# Altium PCB PCB_GTV3.3.PcbDoc (part 8 of 11)
Units mil, origin at the board's own origin, x right, y up, seen from the top; angles counter-clockwise.
Board outline 8070.87 x 4881.89 mil, 4 copper layers (Top Layer, GND, PWR, Bottom Layer), stack 61.653 mil thick; 464 components, 293 nets, 1458 pads, 748 vias.
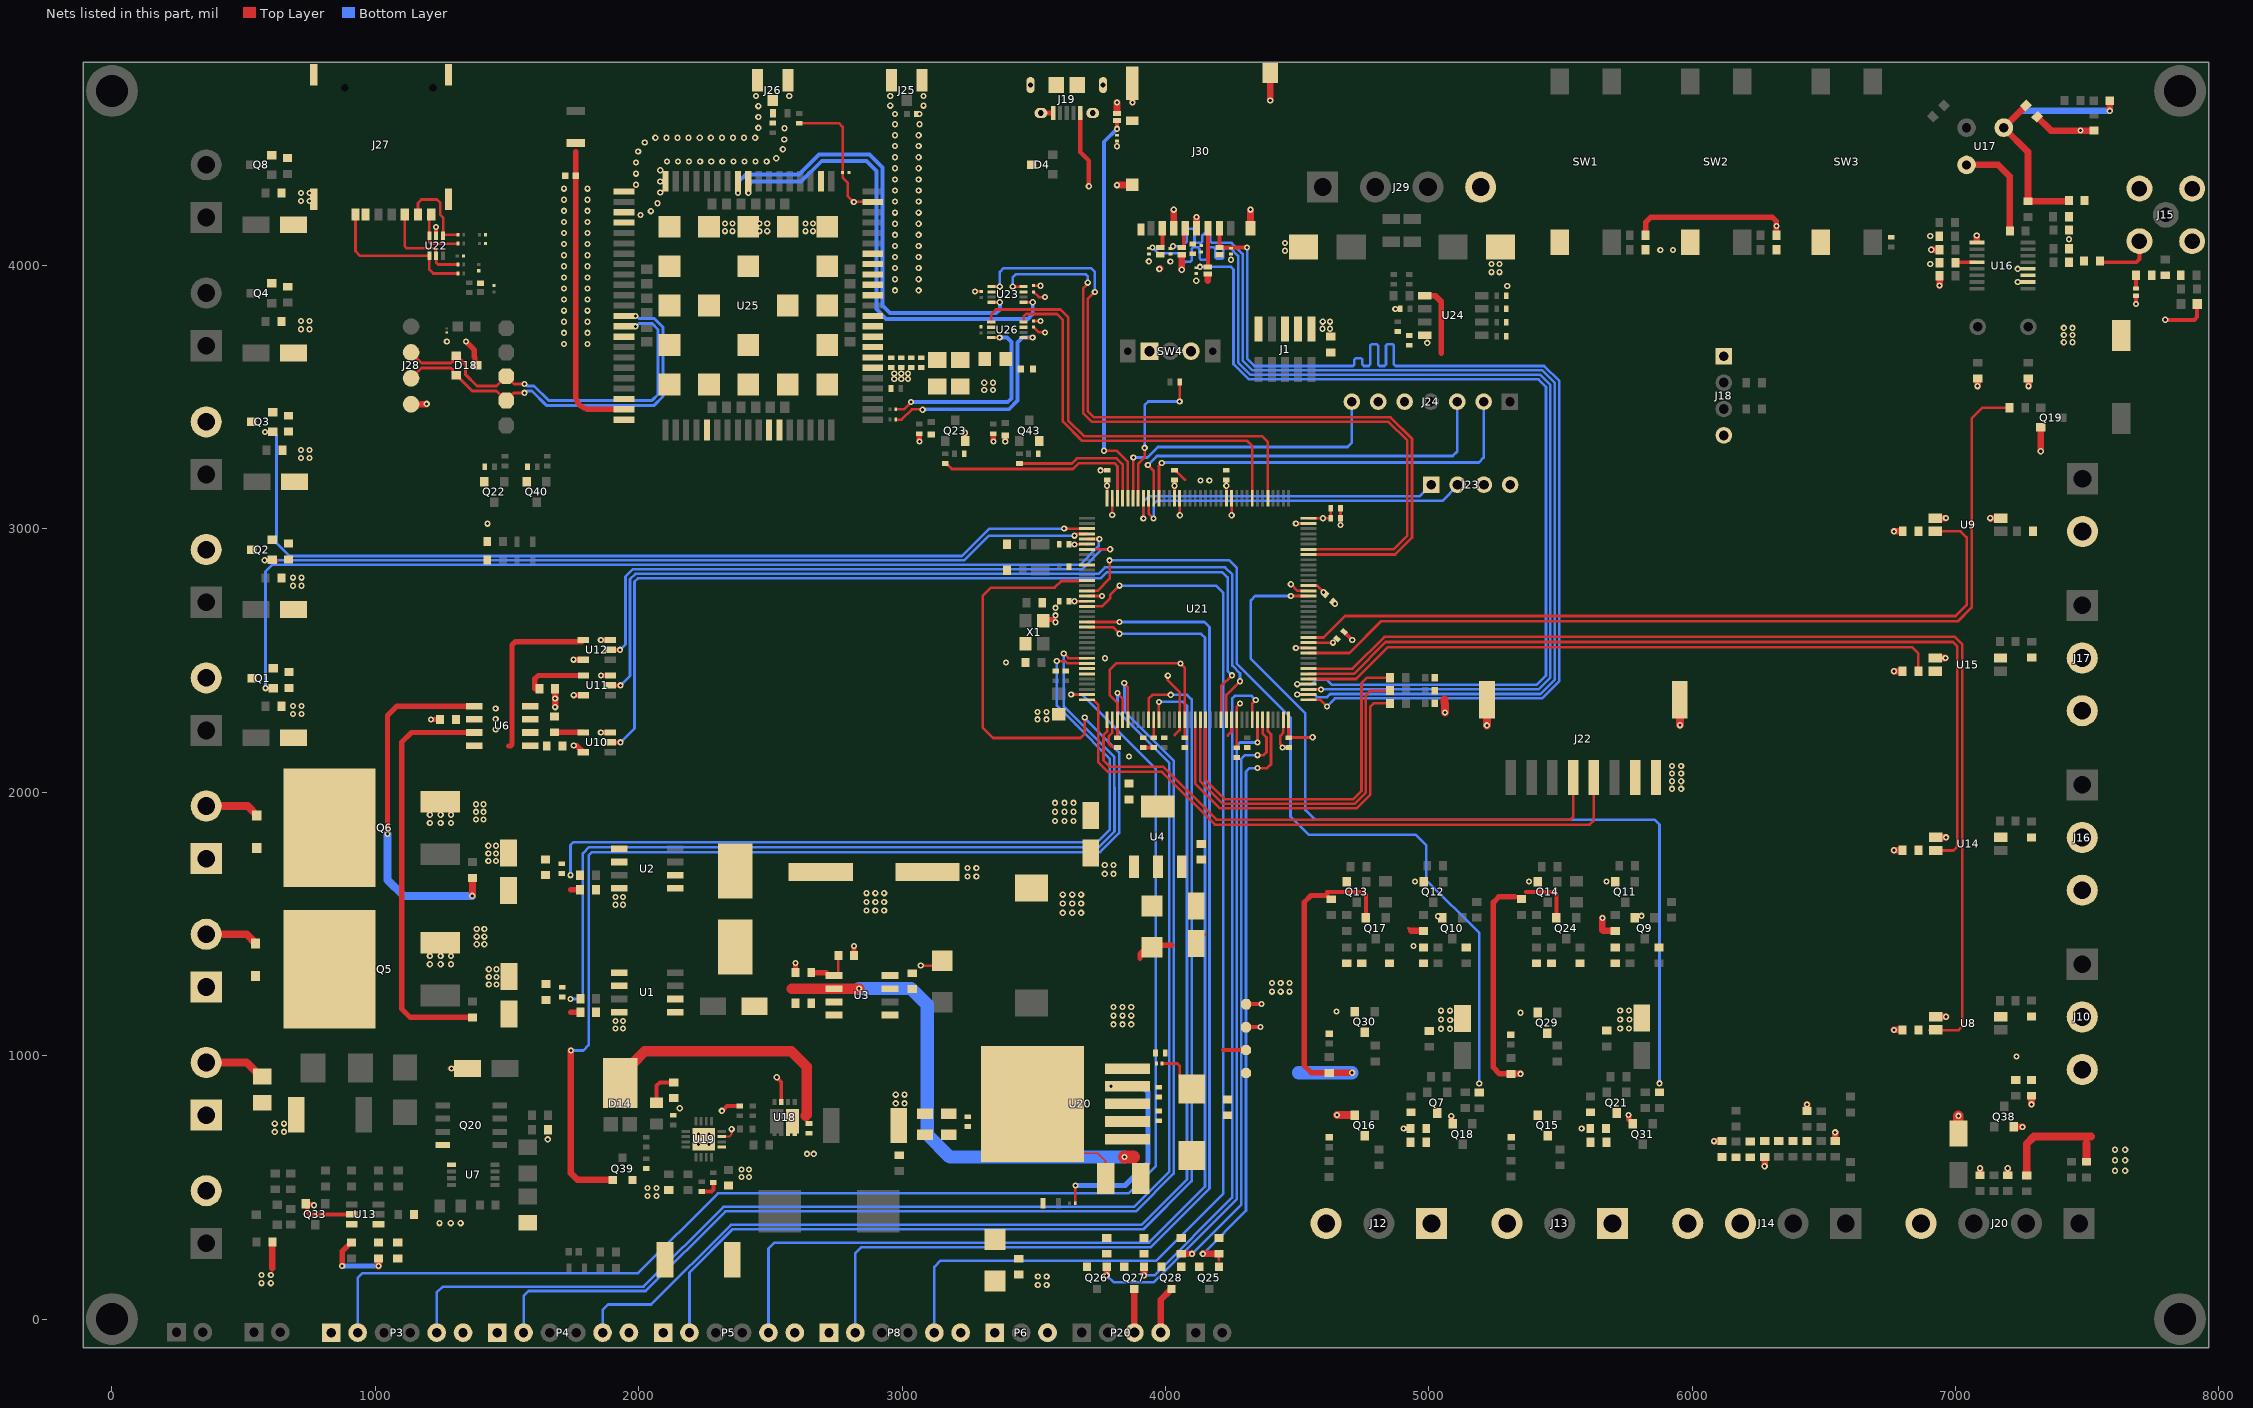
[diagram p5: the nets of this part, all layers, seen from the top]

## Via types
v1: diameter 23.62, hole 11.81, Top Layer to Bottom Layer, tented both sides, 422 vias
v2: diameter 23.62, hole 11.81, Top Layer to Bottom Layer, 326 vias

## Nets (pads, with @x,y where several pads share a name; then routed paths per layer and width w, separated by ;. In a path a pad name is that pad's centre, name@x,y a point inside that pad or via, vN(x,y) a via of type N, cw(c..) or ccw(c..) an arc to the next point about the centre after c; other vN are vias at no path point) (continued)
GND: (continued)
  Top Layer w25: R34.2@608.87,293.03 609.03,292.87 609.03,193.03 ; J28.4@1136.43,3474.17 v1@1194.17,3474.17 ; v2@1682.87,2327.21 v2(1682.87,2356.12) R84.2@1682.87,2393.03 ; v1(3816,4305.19) 3816.63,4305.81 J30.S2@3874.06,4305.81 ; D24.1@3816,4584.4 v1(3816,4619.29) ; v1@3874.32,4619.56 J30.S3@3874.32,4662.3 ; v1(3976.65,3986.97) v1@3980,3990.32 ; J30.6@4031.27,4141 v1(4031.27,4212.12) ; v1(4061.84,3983.97) D22.1@4061.84,4033.92 ; 4160.84,3942.3 D21.1@4160.84,3960.17 ; J30.S1@4322.88,4141.26 v1(4322.88,4212.12) ; v1(4397.68,4627) 4397.68,4672.74 J30.S4@4397.68,4730.74 ; v2(6082.87,675.4) C42.2@6112.87,675.4 ; v2(6275.03,580.03) R103.2@6275.03,615.4 ; C79.1@6435.87,790.03 v2(6435.87,815.03) ; R113.1@6542.76,676.51 v2(6542.76,709.05) ; U15.3@6922.43,2509.75 6922.54,2509.86 v2(6961.06,2509.86) ; U9.3@6923.21,3040.92 6923.32,3041.03 v2(6962.87,3041.03) ; U8.3@6924.21,1147.92 6924.32,1148.03 v2(6963.87,1148.03) ; U14.3@6924.21,1828.92 6924.32,1829.03 v2(6963.87,1829.03) ; v2(6939.37,3923.87) C70.2@6939.37,3960.54 ; U17.3@7041.56,4381.98 7162.03,4381.98 7205.87,4338.13 R105.1@7205.87,4131.37 ; 7080.43,4094.42 v2(7080.43,4113.87) ; v2(7083.41,3542) 7083.41,3570.51 C72.1@7083.93,3571.03 ; C40.2@7092.99,546.03 v2(7092.95,572.76) ; v2(7131.59,3040.81) 7171.13,3040.81 U9.2@7171.25,3040.92 ; R66.1@7197.88,546.15 v2(7197.88,572.76) ; Q38.2@7221.38,729.78 v2(7253.92,729.78) ; C71.1@7275.93,3571.03 7277,3569.96 v2(7277,3542) ; v2(7288.34,815.38) C39.2@7288.34,847.92 ; C76.2@7309.39,4565.16 7362.02,4512.53 v1(7473.87,4512.53) R53.1@7525.38,4512.53 ; v2(7323.5,3295) Q19.2@7323.5,3385.63
  Top Layer w30: J2.2@357.92,974.12 511.35,974.12 544.98,940.49 C2.1@544.98,939.51 ; v2(4650.87,774.4) 4719.24,774.4 Q16.2@4719.36,774.29 ; v1(5220.24,2254.36) J22.MP2@5220.24,2350.68 ; v1(5953.16,2254.99) J22.MP1@5953.16,2351.31
  Top Layer w40: D12.2@7010.76,704.89 v2(7010.76,771.69)
  Top Layer w50: P4.6@1961.87,-50.43 P4.6@1962.87,-51.43 ; P5.6@2592.62,-51.43 P5.6@2593.87,-50.18 ; P8.6@3222.37,-51.43 P8.6@3222.87,-50.93 ; P6.3@3551.87,-51.18 P6.3@3552.12,-51.43
  Bottom Layer w70: P6.3@3552.12,-51.43 P6.3@3552.29,-51.27
  other v1: 5045.87,1101.9 5079.87,1101.9 5726.37,1102.9 5760.37,1102.9 5045.87,1136.9 5726.37,1137.9 5045.87,1170.9 5079.87,1170.9 5726.37,1171.9 5760.37,1171.9 1207,1346.99 1248,1346.99 1287,1346.99 1207,1378.99 1248,1378.99 1287,1378.99 1207,1883 1248,1883 1287,1883 1207,1915 1248,1915 1287,1915 3862,2135.66 687.87,2297.07 720,2297.07 687.87,2328 720,2328 3770.01,2509.03 687.87,2784.11 720,2784.11 687.87,2815.03 720,2815.03 4132.71,3183.5 4166.57,3183.5 717.87,3269.11 750,3269.11 717.87,3300.03 750,3300.03 2970.31,3569.63 2996.8,3569.63 3022.8,3569.63 2970.31,3590.25 2996.8,3590.25 3022.8,3590.25 1715.89,3702.37 1805.85,3702.37 1715.89,3744.48 1805.85,3744.48 717.87,3758.07 750,3758.07 1715.89,3786.59 1805.85,3786.59 717.87,3789 750,3789 1715.89,3828.7 1805.85,3828.7 1715.89,3870.82 1805.85,3870.82 2973,3906 3063,3906 1715.89,3912.93 1805.85,3912.93 3525.38,3923.47 7235.87,3937.53 2973,3948.11 3063,3948.11 1715.89,3955.04 1805.85,3955.04 7235.87,3987.53 2973,3990.23 3063,3990.23 1715.89,3997.16 1805.85,3997.16 6903.87,4005.64 2973,4032.34 3063,4032.34 1715.89,4039.27 1805.85,4039.27 5879,4059 5927,4059 2973,4074.45 3063,4074.45 1715.89,4081.38 1805.85,4081.38 6903.87,4111.87 2973,4116.57 3063,4116.57 1715.89,4123.5 1805.85,4123.5 2973,4158.68 3063,4158.68 1715.89,4165.61 1805.85,4165.61 2007.04,4191.51 2973,4200.79 3063,4200.79 2046.08,4206.47 1715.89,4207.72 1805.85,4207.72 2071.23,4236.51 2973,4242.91 3063,4242.91 717.87,4245.07 750,4245.07 1715.89,4249.84 1805.85,4249.84 717.87,4276 750,4276 2081.74,4277.51 2973,4285.02 3063,4285.02 1715.89,4291.95 1805.85,4291.95 1990,4306.77 2081.74,4319.63 2973,4327.13 3063,4327.13 1990,4348.89 2081.74,4361.74 2973,4369.25 3063,4369.25 1990,4391 2106.91,4395.15 2149.03,4395.15 2191.14,4395.15 2233.25,4395.15 2275.37,4395.15 2317.48,4395.15 2359.59,4395.15 2401.71,4395.15 2443.82,4395.15 2485.93,4395.15 2522.07,4407.56 2973,4411.36 3063,4411.36 1998,4433.11 2547.22,4441.6 2973,4453.47 3063,4453.47 2023.15,4467.15 2552.67,4479.03 2063.19,4485.11 2105.3,4485.11 2147.41,4485.11 2189.53,4485.11 2231.64,4485.11 2273.75,4485.11 2315.87,4485.11 2357.98,4485.11 2400.09,4485.11 2442.21,4485.11 2973,4494.58 3063,4494.58 2553.67,4521.14 2454.11,4523 2973,4536.7 3066,4536.7 2454.11,4564.11 2973,4575 3066,4575 2454.11,4605.23 2954.91,4607.11 3081.05,4607.11 3874.59,4619.29 2445.45,4644.09 2571.59,4644.09 2954.91,4644.09 3081.05,4644.09
  other v2: 568.2,136.36 603.2,136.36 568.2,167.36 603.2,167.36 1243.98,364.16 1286.39,364.16 1323.98,364.16 766.67,432 2638.56,627.43 2664.48,627.43 1654.87,682.4 4904.52,723.51 5580.21,723.51 2155.89,800.39 5080.87,1135.9 5761.37,1136.9 5348,1163 4649.2,1167.51 1430.95,1270.14 1459.79,1270.14 1430.95,1299.07 1459.79,1299.07 1430.95,1328 1459.79,1328 5035.03,1529.4 5807.7,1531.06 4947.18,1661.06 5380.55,1661.06 5674.81,1661.06 3769.62,1690.56 3803.12,1690.56 3769.62,1723.56 3803.12,1723.56 1429,1739.14 1457.83,1739.14 1429,1768.07 1457.83,1768.07 1429,1797 1457.83,1797 5923.17,2013.18 5958,2013.18 5923.17,2042.11 5958,2042.11 5923.17,2071.03 5958,2071.03 5923.17,2099.96 5958,2099.96 1856.28,2227.1 1682.87,2323.21 1856.69,2443.46 3394.16,2493.31 1856.28,2578.32 3583,2672.02 3583,2700.37 1271.6,3711.4 5237.87,3974.83 5267.87,3974.83 5237.87,4006.03 5267.87,4006.03 4454.07,4056.03 4454.07,4086.03 7430.69,4100.03 2327.52,4130.49 2356.36,4130.49 2459.13,4130.49 2487.96,4130.49 2632.77,4130.49 2661.6,4130.49 2327.52,4159.42 2356.36,4159.42 2459.13,4159.42 2487.96,4159.42 2632.77,4159.42 2661.6,4159.42
GND_DRV_1: D25.1 J3.1 Q5.3
GND_DRV_2: D26.1 J4.1 Q6.3
GNSS_ANT: C96.2 J26.1 L6.2 | length 0
GNSS_MCU_RX: U21.116 U26.8 | length 1525.1
  Top Layer w10: U26.8@3460.89,3785.56 3460.89,3786.05 3461.3,3786.47 3461.3,3806.47 3470.78,3815.94 3587.29,3815.94 3610.09,3793.15 3610.09,3408.07 3683.35,3334.81 4310.28,3334.81 4329.56,3315.53 U21.116@4329.56,3116.51
GNSS_MCU_TX: U21.113 U26.1 | length 1738.5
  Top Layer w10: U26.1@3338.84,3785.56 3338.84,3815.53 3356.26,3832.94 3601.68,3832.94 3631.58,3803.04 3631.58,3410.62 3689.82,3352.38 4366,3352.38 4388.62,3329.76 U21.113@4388.62,3116.51
GNSS_PWRCTRL: R134.2 U21.10
GNSS_RXD: R135.2 U26.4 | length 754.3
  Top Layer w10: R135.2@2975.69,3454.33 3007.45,3454.33 3033.84,3480.72 v1(3033.84,3481.89) ; U26.4@3338.84,3726.51 v1(3370.59,3726.51)
  Bottom Layer w15: v1(3033.84,3481.89) 3401.22,3481.89 3415.29,3495.97 3415.29,3709.15 3397.93,3726.51 v1(3370.59,3726.51)
GNSS_TXD: R140.2 U26.5 | length 814.4
  Top Layer w10: R140.2@2975.69,3414.96 2997.56,3414.96 3036.93,3454.33 3076.35,3454.33 v1(3078.1,3452.58) ; U26.5@3460.89,3726.51 v1(3495.78,3726.51)
  Bottom Layer w15: v1(3078.1,3452.58) 3079.75,3454.23 3085.84,3454.23 3085.95,3454.33 3405.29,3454.33 3438.76,3487.8 3438.76,3707.96 3457.31,3726.51 v1(3495.78,3726.51)
GSM_BUCK_EN: C9.1 C90.2 C91.1 D11.1 R3.2 U3.6 U20.1 U20.2 | length 1845.1
  Top Layer w10: 3878.2,615.03 3880.96,617.8 3880.96,620.61
  Top Layer w40: 2581.7,1254.61 U3.6@2741.39,1254.61 ; U3.6@2752.88,1254.61 v2(2837,1254.61)
  Top Layer w50: v2(3844.87,615.03) 3878.2,615.03
  Bottom Layer w50: v2(2837,1254.61) 3034.38,1254.61 3095.76,1193.22 3095.76,700.72 3181.45,615.03 v2(3844.87,615.03)
GSM_PWR: C88.2 C89.1 D10.2 FB1.2 P9.1 R130.2 R131.2 R132.2 R137.2 R145.2 U20.4 | length 1135.7
  Top Layer w10: R132.2@3657.69,440.03 v2@3657.69,506.31 ; R130.2@3987.06,970.16 4045.1,970.16 4054.14,961.12 4054.14,919.75 4060.71,913.18 4060.71,899.03 4069.9,889.85 4084.04,889.85 C89.1@4099.73,874.16 4099.73,878.49 C89.1@4145.32,924.08
  Top Layer w15: 4218.87,1021.36 P9.1@4305.75,1021.36
  Bottom Layer w20: v2(3658.36,506.98) 3846.92,506.98 3933.59,593.66 3933.59,861.41 3911.04,883.96 v2(3793,883.96)
  other v1: 3312,3528 3345,3528 3312,3555 3345,3555
  other v2: 3803,1119 3836.5,1119 3870,1119 3803,1152 3836.5,1152 3870,1152 3803,1185 3836.5,1185 3870,1185 2865,1551 2898.5,1551 2932,1551 2865,1584 2898.5,1584 2932,1584 2865,1617 2898.5,1617 2932,1617 1426,3020
GSM_PWR_EN: R146.2 U21.141 | length 538.3
  Top Layer w10: R146.2@3445.65,3248.53 3644.5,3248.53 3664.2,3268.24 3814.69,3268.24 3837.43,3245.49 U21.141@3837.43,3116.51
GSM_RST: R154.1 U21.142 | length 797.6
  Top Layer w10: R154.1@3164.2,3248.53 3167.7,3248.53 3188.7,3227.53 3648.96,3227.53 3670.99,3249.57 3806.07,3249.57 3817.75,3237.89 U21.142@3817.75,3116.51
GSM_RX: U23.4 U25.10 | length 1700.3
  Top Layer w10: U23.4@3339.26,3860.68 v1(3371,3860.68)
  Bottom Layer w15: v1(2376.87,4276.03) 2376.87,4316.38 2406.93,4346.44 2608.84,4346.44 2684.37,4421.97 2877.12,4421.97 2926,4373.09 2926,3847.74 2954.33,3819.42 3356.92,3819.42 3371,3833.5 v1(3371,3860.68)
GSM_TX: U23.5 U25.9 | length 1790.5
  Top Layer w10: U23.5@3461.3,3860.68 v1(3496.19,3860.68)
  Bottom Layer w15: v1(2416.24,4276.03) 2416.24,4304.44 2430.79,4318.99 2616.32,4318.99 2695,4397.67 2864.53,4397.67 2902.4,4359.8 2902.4,3834.43 2939.41,3797.42 3477.34,3797.42 3496.19,3816.27 v1(3496.19,3860.68)
GSM_USB_D_N: D18.1 J28.2 P14.1 U25.28 | length 1449.2
  Top Layer w11: J28.2@1135.6,3670.19 1175.31,3630.48 1235.58,3630.48 ; 1235.6,3630.5 1287.58,3630.5 1294.02,3636.94 1294.02,3647.76 1304.66,3658.4 1308.6,3658.4 1341.63,3625.37 1341.63,3587.41 1385.95,3543.09 1460.56,3543.09 P14.1@1497,3579.53 1497.96,3579.53 1527.09,3550.4 v1(1566,3550.4)
  Bottom Layer w11: v1(1566,3550.4) 1569.42,3550.4 1576.73,3543.09 1602.43,3543.09 1657.19,3488.32 2051.11,3488.32 2073.02,3510.24 2073.02,3757.76 2051.33,3779.46 2001.02,3779.46 1990.83,3769.27 v1(1988.26,3769.27)
GSM_USB_D_P: D18.2 J28.3 P13.1 U25.27 | length 1466.8
  Top Layer w11: J28.3@1135.6,3571.76 1175.31,3611.48 1243.45,3611.48 ; 1243.47,3611.5 1287.58,3611.5 1294.02,3605.06 1294.02,3594.24 1312.43,3575.83 1316.36,3575.83 1368.11,3524.09 1460.56,3524.09 P13.1@1497,3487.64 1497.96,3487.64 1527.09,3516.78 v1(1566,3516.78)
  Bottom Layer w11: v1(1566,3516.78) 1569.42,3516.78 1576.73,3524.09 1594.56,3524.09 1649.32,3469.32 2058.98,3469.32 2092.02,3502.37 2092.02,3765.63 2059.2,3798.46 2001.02,3798.46 1990.83,3808.64 v1(1988.26,3808.64)
HEAT_CNTRL: R33.1 U21.93 | length 3458.2
  Top Layer w10: v1(4476,2745.25) U21.93@4543.34,2745.25
  Bottom Layer w10: v1(4476,2745.25) 4340.58,2745.25 4324.16,2728.83 4324.16,2506.8 4530.83,2300.13 4530.83,1932.07 4567.01,1895.89 5857.01,1895.89 5875.87,1877.03 v2(5875.87,895.03)
HEATER: C44.2 J12.1 Q7.3 R26.1 SB2.2 | length 2.1
  Top Layer w25: J12.1@5010.15,363.03 J12.1@5011.64,364.52
HMI_UART.RX_HMI: J22.4 U21.36 | length 2393.5
  Top Layer w10: U21.36@3726.65,2350.75 3745.37,2332.03 3745.37,2113.63 3781,2078 3986.92,2078 4187.96,1876.96 5610.16,1876.96 5626.39,1893.19 J22.4@5626.39,2056.03
HMI_UART.TX_HMI: J22.5 U21.37 | length 2190.4
  Top Layer w10: U21.37@3778.38,2275.56 3778.38,2230.64 3764.73,2216.99 3764.73,2121.19 3788.88,2097.03 3991.93,2097.03 4192.97,1896 5537.72,1896 5547.65,1905.93 J22.5@5547.65,2056.03
I2C_ENCODER.SCL: J23.2 U21.136 | length 1325.6
  Top Layer w10: U21.136@3935.86,3116.51 3935.86,3059.17 v1(3955.03,3040)
  Bottom Layer w10: v1(3955.03,3040) 3955.03,3094.85 3967,3106.82 5051.33,3106.82 5108.87,3164.36 J23.2@5108.87,3168.03
I2C_ENCODER.SDA: J23.1 U21.137 | length 1260.1
  Top Layer w10: v1(3916,3040) 3916.09,3040.09 3916.09,3116.42 U21.137@3916.17,3116.51
  Bottom Layer w10: v1(3916,3040) 3916,3104.26 3935.55,3123.82 4964.65,3123.82 J23.1@5008.87,3168.03
I34_MicroSD_DET: D24.2 J30.SW-A R160.1 U21.140 | length 1519
  Top Layer w10: v1(3767,3297) 3814.18,3297 3857.12,3254.06 U21.140@3857.12,3116.51
  Top Layer w15: v1(3816,4519) D24.2@3816,4550.22
  Bottom Layer w15: v1(3767,3297) 3767,4470 v1(3816,4519)
IN+: R11.1 R30.2 U13.3 | length 269.8
  Top Layer w10: R30.2@1012.14,230.46 R30.2@1012.14,230.46
  Top Layer w20: v2@874.04,203.46 874.04,257.18 902.32,285.46 904.82,285.46 R11.1@909.82,290.46
  Top Layer w25: v2(1012.18,201.16) R30.2@1012.14,230.46
  Bottom Layer w20: v2(874.04,201.16) v2@1011.2,201.16
IN-: R30.1 R32.1 U13.4
INA_1#: R83.1 U6.2 U10.4 | length 109.3
  Top Layer w20: R83.1@1680.8,2227.89 U10.4@1790.1,2227.89
INB_1#: R84.1 U6.4 U11.4 | length 228
  Top Layer w20: 1604.87,2393.03 1604.87,2429.66 1618.81,2443.61 U11.4@1790.51,2443.61
IND1: LED5.2 Q16.3
IND2: LED4.2 Q15.3
IND3: LED6.2 Q29.3
IND4: LED7.2 Q30.3
IO_A11: R15.1 U21.55 | length 1384.9
  Top Layer w10: U21.55@4132.71,2275.56 4132.71,2041.84 4196.55,1978 4218.57,1955.98 4677.52,1955.98 4718.4,1955.98 4761.1,1998.67 4761.1,2039.56 4761.1,2053.14 4761.1,2369.48 4777.88,2386.27 R15.1@4852.86,2386.27
IO_A12: R17.1 U21.54 | length 1381.2
  Top Layer w10: U21.54@4113.03,2275.56 4113.03,2033.74 4207.78,1938.98 4684.56,1938.98 4725.45,1938.98 4778.1,1991.63 4778.1,2032.52 4778.1,2324.9 4790.7,2337.5 R17.1@4852.86,2337.5
IO_C9: R28.1 U21.15 | length 3246.7
  Top Layer w10: U21.15@3702.4,2764.93 3741.16,2764.93 3788,2811.77 v1(3788,2880.81)
  Bottom Layer w10: v1(3788,2880.81) 4242.63,2880.81 4271.16,2852.27 4271.16,2487.67 4474.82,2284.02 4474.82,1907.48 4543.4,1838.89 4950.12,1838.89 4989.87,1799.14 4989.87,1667.03 5191.41,1465.49 v2(5191.41,894.03)
IO_C13: R14.1 U21.56 | length 1390.7
  Top Layer w10: U21.56@4152.14,2275.56 4152.14,2046.45 4225.61,1972.98 4711.36,1972.98 4744.1,2005.72 4744.1,2414.62 4764.52,2435.03 R14.1@4852.36,2435.03
"IPK SNS": R3.1 U3.1 U3.7 U3.8
IRQ_NFC: J24.7 U21.139 | length 1163.8
  Top Layer w10: U21.139@3876.8,3116.51 3877.32,3117.02 3877.32,3270.32 v1(3878,3271)
  Bottom Layer w10: v1(3878,3271) 3930.92,3271 3971.1,3311.19 4691.58,3311.19 4707.87,3327.48 J24.7@4707.87,3483.03
LED_SIG.R_CNTRL: Q26.1 R73.1 U21.66 | length 2560.2
  Top Layer w10: Q26.1@3776.87,198.66 Q26.1@3777.1,198.89 ; v1(4349.25,2189) U21.66@4349.25,2275.56
  Top Layer w25: v2(3776.87,166.03) Q26.1@3776.87,198.66
  Bottom Layer w10: v2(3776.87,166.03) 3803.68,139.22 3954.85,139.22 4270.14,454.52 4270.14,2175.47 4283.67,2189 v1(4349.25,2189)
LED_SIG.W_LED_CNTRL: Q25.1 R72.1 U21.68 | length 2264.6
  Top Layer w10: 4203.51,223.09 4202.23,224.37 4202.23,246.76 R72.1@4203.51,248.03 ; v1(4349.25,2092) 4386.03,2092 4400.59,2106.56 4400.59,2220.24 4388.62,2232.21 U21.68@4388.62,2275.56
  Top Layer w25: v2(4141.83,247.68) R72.1@4201.31,247.68
  Bottom Layer w10: v2(4141.83,247.68) 4305.75,411.6 4305.75,2078.5 4319.24,2092 v1(4349.25,2092)
LEVEL_IN: J11.2 R80.2
LEVEL_MCU: R79.1 U9.4 U21.85 | length 2934.5
  Top Layer w10: U21.85@4543.34,2587.77 4600.51,2587.77 4681.93,2669.18 4729.2,2669.18 6999.98,2669.18 7041.85,2711.06 7041.85,2967.79 7018.71,2990.92 U9.4@6923.21,2990.92
MCU_RX: U21.102 U23.8 | length 2926.1
  Top Layer w10: v1(3420.1,3919.74) U23.8@3461.3,3919.74 ; v1(3705,3935) 3705,3931.31 3688,3914.31 3688,3439.21 3720.83,3406.38 4846.7,3406.38 4918.13,3334.95 4918.13,2974.39 4866.15,2922.41 U21.102@4543.34,2922.41
  Bottom Layer w10: v1(3420.1,3919.74) 3420.1,3954.1 3433,3967 3697,3967 3705,3959 v1(3705,3935)
MCU_TX: U21.101 U23.1 | length 3071.2
  Top Layer w10: U23.1@3339.26,3919.74 v1(3371,3919.74) ; v1(3731.81,3900) 3730.46,3900 3705,3874.54 3705,3446.25 3727.87,3423.38 4855.16,3423.38 4936.13,3342.41 4936.13,2966.93 4871.92,2902.73 U21.101@4543.34,2902.73
  Bottom Layer w10: v1(3371,3919.74) 3371,3976 3385,3990 3718,3990 3731.81,3976.19 v1(3731.81,3900)
MEM_CNTRL: Q3.1 R4.1 U21.3 | length 3598.7
  Top Layer w10: v1(3615.36,3001.15) U21.3@3702.4,3001.15
  Bottom Layer w10: v1(580.94,3368) 611.59,3368 625,3354.59 625,2945.89 673.45,2897.44 3227.49,2897.44 3331.2,3001.15 v1(3615.36,3001.15)
MEM_SAVER: J7.2 Q3.3
MISO_NFC: J24.2 U21.134 | length 1581.1
  Top Layer w10: U21.134@3975.23,3116.51 3975.23,3239.49 3985.84,3250.1 v1(3985.84,3250.19)
  Bottom Layer w10: v1(3985.84,3250.19) 3987.81,3252.16 5189.59,3252.16 5207.87,3270.44 J24.2@5207.87,3483.03
MOSI_NFC: J24.3 U21.135 | length 1520.6
  Top Layer w10: v1(3933,3243) 3955.54,3220.46 U21.135@3955.54,3116.51
  Bottom Layer w10: v1(3933,3243) 3967.04,3277 5090.37,3277 5107.87,3294.5 J24.3@5107.87,3483.03
NetC8_2: C8.2 C13.2 C14.2 C15.2 C28.2 C92.2 FB1.1 U25.55 U25.56 U25.57
NetC20_2: C20.2 U3.3
NetC41_2: C41.2 C57.2 D14.3 R119.1 U18.6 | length 1122.1
  Top Layer w15: R119.1@2067.75,820.67 2067.75,886.15 2080.27,898.67 C57.2@2132.75,898.67
  Top Layer w40: D14.3@1929.97,896.44 1929.97,925.97 1976.11,972.11 1979.19,972.11 2023.54,1016.47 2579.02,1016.47 2638,957.49 2638,776.2 2633.97,772.17
NetC42_1: C42.1 R110.2 R111.2
NetC54_1: C54.1 U16.12 | length 82.3
  Top Layer w12: C54.1@6998.87,4010.7 7000.7,4012.53 U16.12@7080.43,4012.53